# Altium PCB OFP_MCM_v1.6.PcbDoc (part 7 of 8)
Units mm, origin at the board's own origin, x right, y up, seen from the top; angles counter-clockwise.
Board outline 110 x 120 mm, 4 copper layers (Top Layer, Layer 1, Layer 2, Bottom Layer), stack 1.576 mm thick; 381 components, 285 nets, 1332 pads, 552 vias.
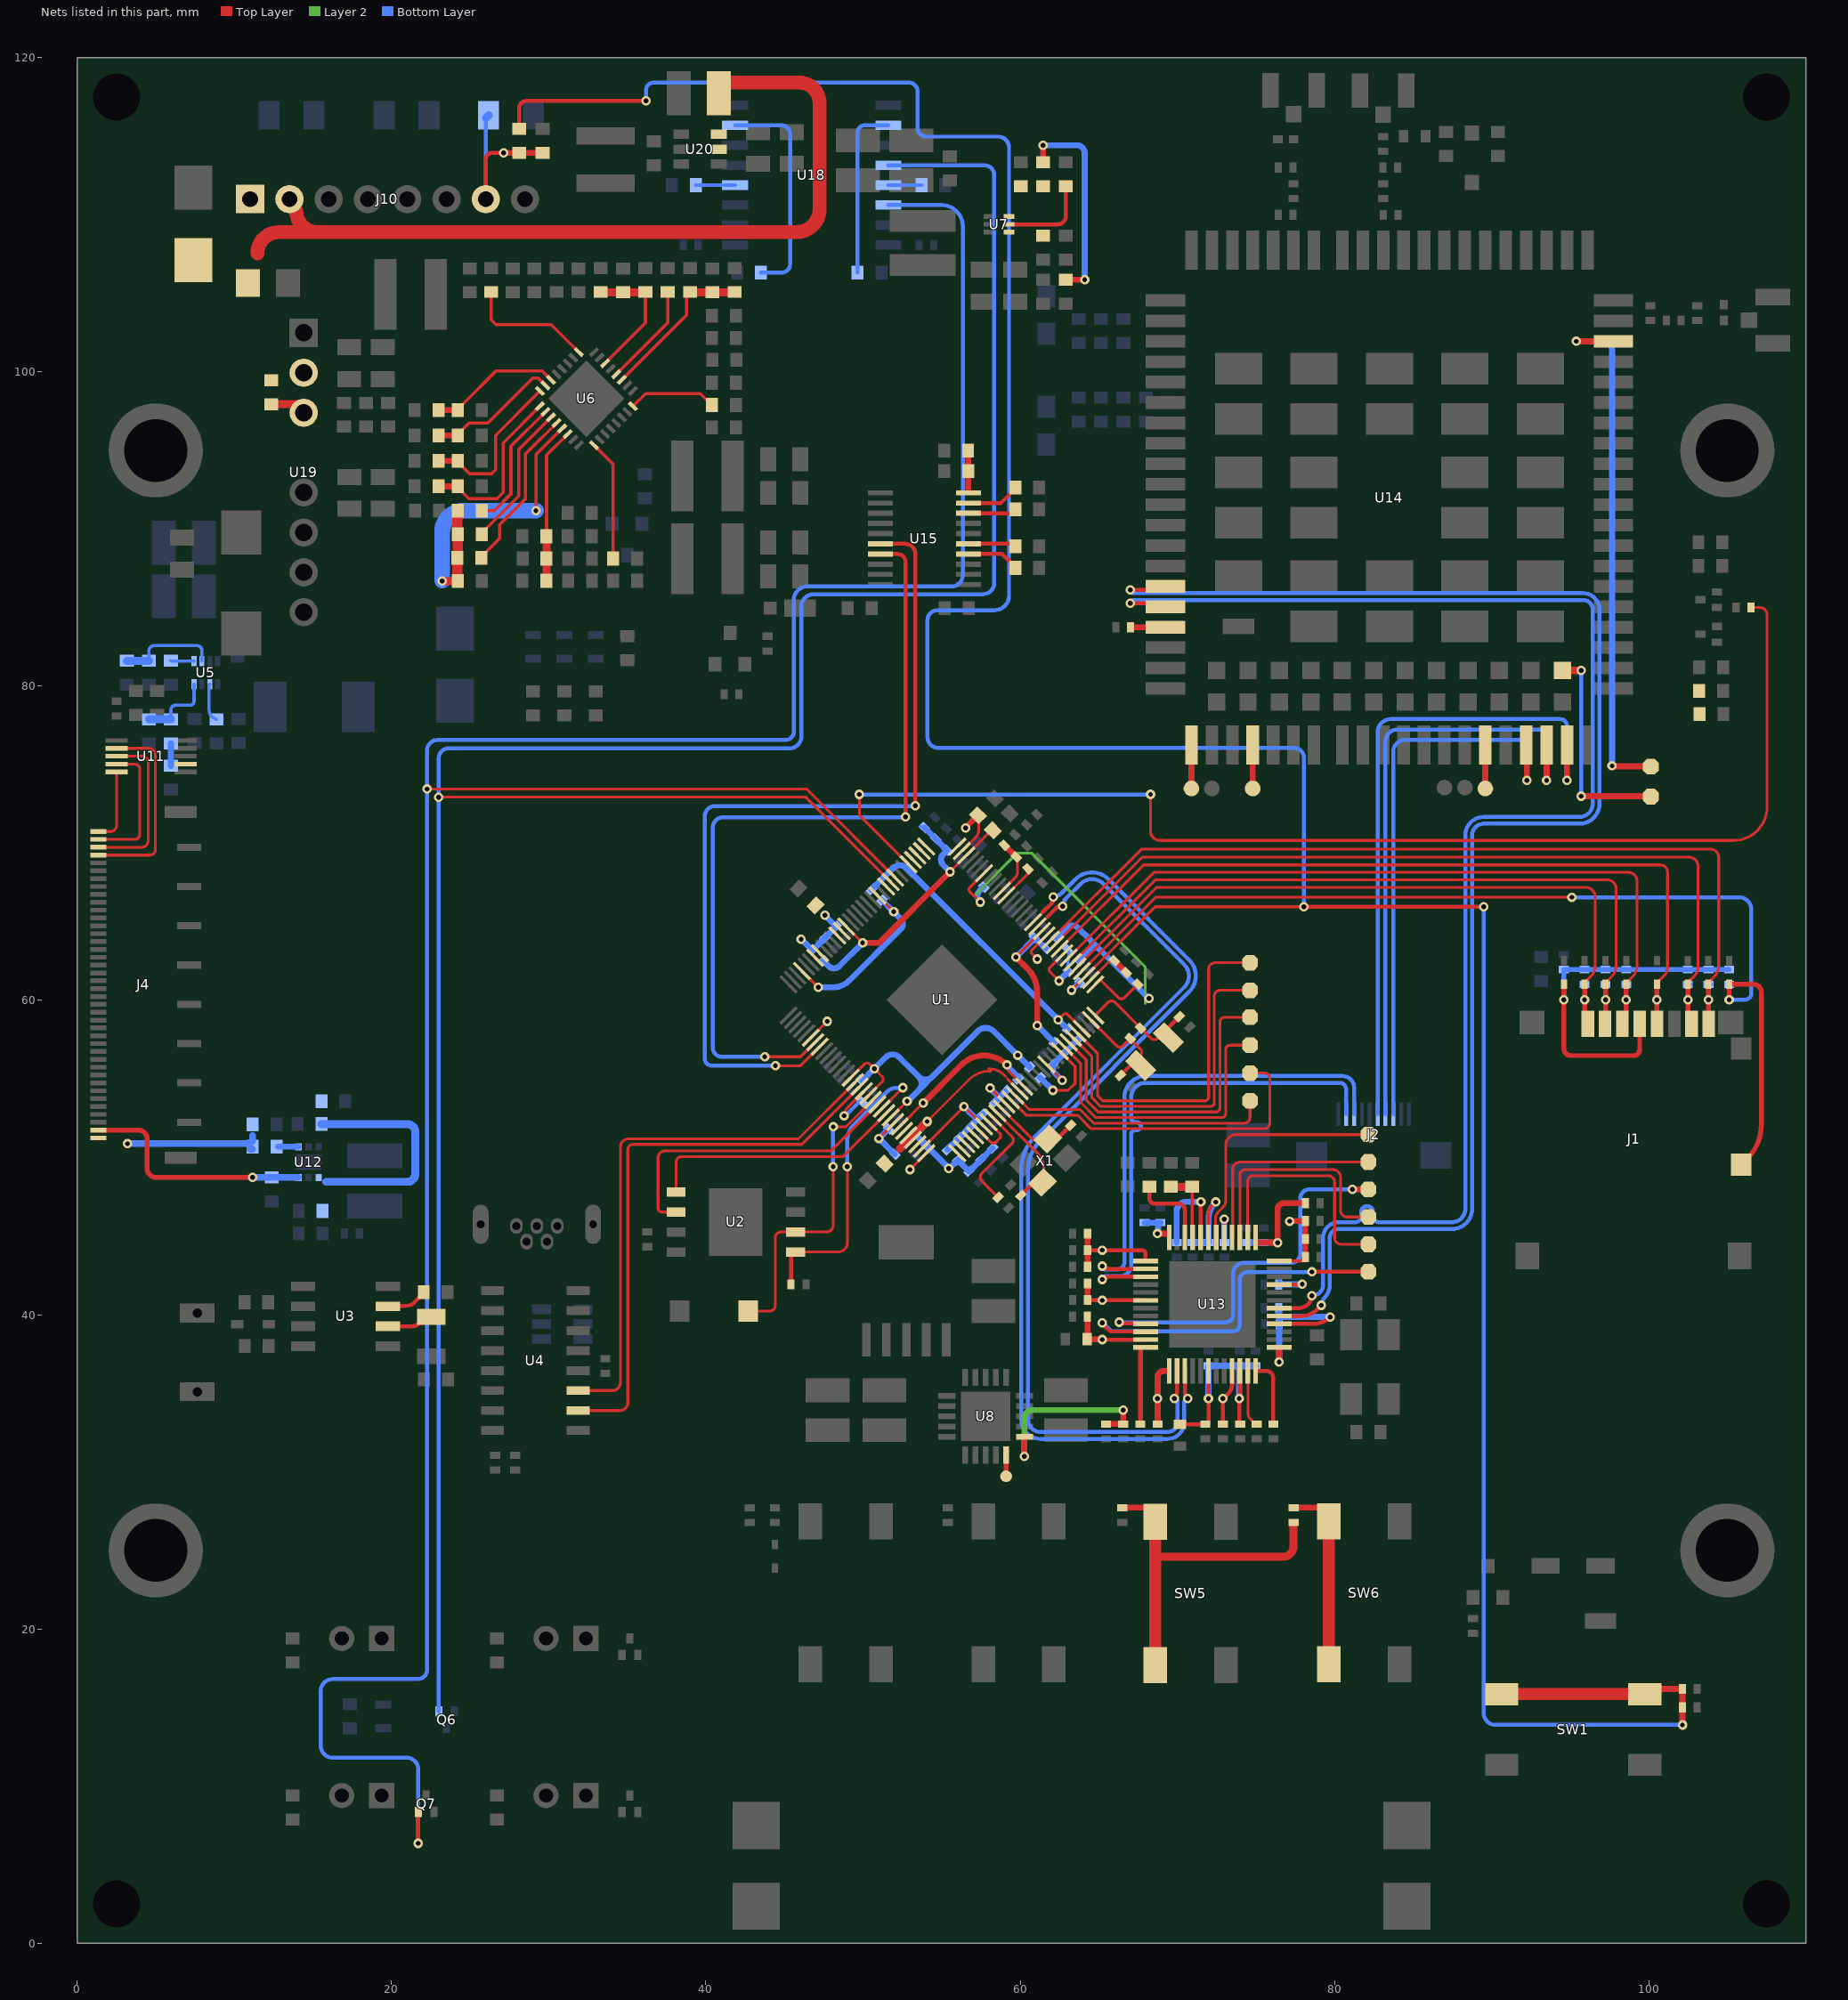
[diagram p6: the nets of this part, all layers, seen from the top]

## Via types
v1: diameter 0.6, hole 0.3, Top Layer to Bottom Layer, tented both sides, 552 vias

## Nets (pads, with @x,y where several pads share a name; then routed paths per layer and width w, separated by ;. In a path a pad name is that pad's centre, name@x,y a point inside that pad or via, vN(x,y) a via of type N, cw(c..) or ccw(c..) an arc to the next point about the centre after c; other vN are vias at no path point) (continued)
NetR15_2: R15.2 R16.2 SW5.3 SW5.4 | length 22.3
  Top Layer w0.254: 68.608,25.006 68.608,25.009
  Top Layer w0.381: R15.2@66.5,27.723 68.048,27.723 SW5.3@68.608,26.81
  Top Layer w0.508: 68.608,24.587 76.687,24.587 ccw(c76.687,25.3) 77.4,25.3 R16.2@77.4,26.716
  Top Layer w0.762: SW5.4@68.608,17.71 68.608,24.587 68.608,25.006 ; 68.608,25.009 SW5.3@68.608,26.81
NetR16_1: R16.1 SW6.3 SW6.4 | length 11.9
  Top Layer w0.381: R16.1@77.4,27.723 79.027,27.723 79.65,27.1 SW6.3@79.65,26.852
  Top Layer w0.762: SW6.4@79.65,17.752 SW6.3@79.65,26.852
NetR20_2: R20.2 U3.3 | length 2.6
  Top Layer w0.254: U3.3@19.77,40.536 20.418,40.558 20.874,40.558 ccw(c20.874,41.439) 21.535,40.857 21.794,41.151 R20.2@22.048,41.439
NetR39_1: R39.1 U5.6 | length 2.5
  Bottom Layer w0.203: U5.6@8.436,80.122 8.393,80.079 8.393,78.676 8.393,78.483 ccw(c9.067,78.483) 8.521,78.088 R39.1@8.864,77.889
NetR40_2: R40.2 R43.1 U5.2 | length 6.4
  Bottom Layer w0.203: R43.1@4.562,81.619 4.562,82.248 cw(c4.898,82.248) 4.898,82.583 7.606,82.583 cw(c7.606,82.253) 7.936,82.253 U5.2@7.936,81.592
  Bottom Layer w0.508: R40.2@3.162,81.619 R43.1@4.562,81.619
NetR41_1: R41.1 R46.1 | length 1.4
  Bottom Layer w0.381: R41.1@5.962,74.93 R46.1@5.962,76.365
NetR42_1: R42.1 U6.25 | length 8.2
  Top Layer w0.203: R42.1@26.345,105.089 26.345,103.312 26.642,103.015 30.16,103.015 U6.25@31.916,101.259
NetR44_2: R44.2 R46.2 U5.8 | length 4.9
  Bottom Layer w0.203: R46.2@5.962,77.889 5.962,78.486 cw(c6.259,78.486) 6.259,78.783 7.168,78.783 ccw(c7.168,79.05) 7.436,79.05 U5.8@7.436,80.122
  Bottom Layer w0.508: R44.2@4.562,77.889 R46.2@5.962,77.889
NetR45_2: R45.2 U5.1 | length 1.5
  Bottom Layer w0.203: R45.2@5.962,81.619 5.989,81.592 U5.1@7.436,81.592
NetR50_2: R50.2 U6.3 | length 9.3
  Top Layer w0.203: R50.2@25.74,89.675 26.019,89.954 26.019,90.029 28.1,92.11 28.1,95.061 U6.3@30.148,97.109
NetR51_2: R51.2 U6.2 | length 8.4
  Top Layer w0.203: R51.2@25.74,91.175 26.545,91.175 27.6,92.23 27.6,95.268 U6.2@29.794,97.462
NetR52_1: R52.1 U6.9 | length 7.7
  Top Layer w0.203: U6.9@32.884,95.341 34.1,94.125 R52.1@34.1,88.124
NetR55_2: R55.2 U6.4 | length 10.6
  Top Layer w0.203: R55.2@25.714,88.175 25.714,88.238 25.994,88.518 25.999,88.518 26.889,89.408 26.889,90.281 28.527,91.919 28.527,94.781 U6.4@30.501,96.755
NetR57_1: R57.1 U6.16 | length 5.7
  Top Layer w0.203: U6.16@35.359,97.816 36.169,98.625 39.652,98.625 R57.1@40.384,97.894
NetR58_1: R58.1 U7.4
NetR61_1: R61.1 R66.1 | length 13.3
  Top Layer w0.381: R66.1@61.456,113.333 v1(61.456,114.427) ; R61.1@62.897,105.868 v1@64.11,105.868
  Bottom Layer w0.381: v1(61.456,114.427) 63.602,114.427 cw(c63.602,113.919) 64.11,113.919 v1(64.11,105.867)
NetR62_2: R62.2 U7.5 | length 5.8
  Top Layer w0.254: U7.5@59.287,109.391 62.397,109.391 ccw(c62.397,109.891) 62.897,109.891 R62.2@62.897,111.809
NetR63_2: R63.2 R66.2 U7.6
NetR64_2: R64.2 U6.20 | length 6.6
  Top Layer w0.203: U6.20@34.299,99.845 37.574,103.121 R64.2@37.574,105.089
NetR67_1: R67.1 R68.2 U8.16 | length 12.1
  Top Layer w0.381: v1(60.276,30.988) U8.16@60.276,32.161 ; R67.1@65.459,33.047 R68.2@66.552,33.047 v1(66.552,33.924)
  Layer 2 w0.381: v1(60.276,30.988) 60.276,33.412 cw(c60.789,33.412) 60.789,33.924 v1(66.552,33.924)
NetR82_1: R82.1 R83.2 R85.2 U12.1 | length 14.9
  Bottom Layer w0.508: R85.2@15.538,52.133 21.001,52.133 cw(c21.001,51.625) 21.352,51.992 21.367,51.976 cw(c21.001,51.625) 21.508,51.625 21.508,48.946 cw(c21.022,48.946) 21.425,48.674 21.294,48.542 cw(c21.022,48.946) 21.022,48.46 15.843,48.46
NetR84_1: R84.1 U12.4 | length 1.3
  Bottom Layer w0.381: R84.1@12.78,50.689 U12.4@14.077,50.689
NetR87_2: R87.2 U13.24 | length 5.2
  Top Layer w0.178: R87.2@67.64,33.047 R87.2@67.67,33.077 ; U13.24@67.67,37.856 67.731,37.917 U13.24@67.982,37.917
  Top Layer w0.305: R87.2@67.67,33.077 U13.24@67.67,37.856
NetR88_2: R88.2 R89.2 U13.9 | length 4.6
  Top Layer w0.178: R88.2@70.947,48.139 70.947,44.952 U13.9@70.982,44.917
  Top Layer w0.508: R89.2@69.581,48.139 R88.2@70.972,48.139
NetR90_2: R90.2 U13.35 | length 3.6
  Top Layer w0.178: U13.35@74.482,36.417 74.504,36.395 74.504,33.744 ccw(c75.04,33.744) 74.661,33.365 74.828,33.198 74.828,33.187 74.968,33.047 R90.2@75.056,33.047
NetR91_2: R91.2 U13.36 | length 4.3
  Top Layer w0.254: U13.36@74.982,36.417 75.654,36.417 cw(c75.654,35.958) 76.113,35.958 R91.2@76.113,33.047
NetR92_1: R92.1 U13.5 | length 2.5
  Top Layer w0.254: U13.5@72.981,44.918 v1@72.981,46.086
  Bottom Layer w0.381: R92.1@72.98,44.736 v1(72.98,46.087)
NetR94_1: R94.1 U13.8 | length 6.2
  Top Layer w0.254: U13.8@71.482,44.917 71.491,44.925 71.491,47.176 v1(71.5,47.184)
  Bottom Layer w0.381: R94.1@69.962,44.587 69.962,46.59 cw(c70.557,46.59) 70.557,47.184 v1(71.5,47.184)
NetR95_2: R95.2 U13.10 | length 5.2
  Top Layer w0.254: R95.2@68.224,48.139 68.224,47.407 ccw(c68.565,47.407) 68.565,47.066 70.079,47.066 cw(c70.079,46.663) 70.482,46.663 U13.10@70.482,44.917
NetR102_1: R102.1 R104.1 U15.10 | length 2.6
  Top Layer w0.381: U15.10@56.696,92.371 R104.1@56.696,93.684 R102.1@56.696,94.984
NetR105_2: R105.2 U15.4 | length 3.4
  Top Layer w0.254: U15.4@56.71,88.409 58.86,88.409 59.422,87.846 59.436,87.846 59.69,87.592 R105.2@59.69,87.529
NetR106_2: R106.2 U15.5 | length 3
  Top Layer w0.254: U15.5@56.71,89.059 59.688,89.059 R106.2@59.69,89.056
NetR107_2: R107.2 U15.8 | length 3.1
  Top Layer w0.254: U15.8@56.71,91.009 59.441,91.009 R107.2@59.69,91.258
NetR108_2: R108.2 U15.9 | length 3.4
  Top Layer w0.254: U15.9@56.71,91.659 58.778,91.659 59.69,92.57 R108.2@59.69,92.634
NetR110_2: R110.2 R111.1
NetR115_2: 
NetR123_2: R123.2 U18.7 | length 14.3
  Bottom Layer w0.254: U18.7@41.861,115.696 44.792,115.696 cw(c44.792,115.123) 45.364,115.123 45.364,106.858 cw(c44.831,106.858) 44.831,106.325 R123.2@43.514,106.325
NetR124_1: R124.1 U18.10 | length 11.1
  Bottom Layer w0.254: R124.1@49.655,106.325 49.655,115.238 cw(c50.112,115.238) 50.112,115.696 U18.10@51.611,115.696
NetR125_2: R125.2 U19.3 | length 2.4
  Top Layer w0.508: R125.2@12.35,97.947 12.54,97.947 14.053,97.947 14.273,97.727 U19.3@14.406,97.405
NetR126_2: R126.2 U18.4 | length 2.5
  Bottom Layer w0.254: R126.2@39.368,111.886 U18.4@41.861,111.886
NetR127_1: R127.1 U18.13 | length 2.1
  Bottom Layer w0.254: U18.13@51.611,111.886 R127.1@53.714,111.886
NetTP1_1: TP1.1 U1.92 | length 22.8
  Top Layer w0.178: U1.92@63.646,57.913 64.92,56.639 64.92,53.952 65.259,53.614 71.745,53.614 ccw(c71.745,53.866) 71.997,53.866 71.997,62 cw(c72.396,62) 72.396,62.399 TP1.1@74.627,62.399
NetTP2_1: TP2.1 U1.91 | length 21.7
  Top Layer w0.178: U1.91@63.364,57.63 64.564,56.429 64.564,53.805 65.111,53.258 72.133,53.258 72.248,53.3 72.331,53.382 ccw(c72.133,53.477) 72.353,53.477 72.353,60.279 cw(c72.718,60.279) 72.718,60.644 TP2.1@74.627,60.644
NetTP3_1: TP3.1 U1.90 | length 20.7
  Top Layer w0.178: U1.90@63.081,57.347 64.209,56.219 64.209,53.658 64.964,52.903 72.461,52.903 ccw(c72.461,53.15) 72.708,53.15 72.708,58.62 cw(c73.018,58.62) 73.018,58.93 TP3.1@74.627,58.93
NetTP4_1: TP4.1 U1.89 | length 19.5
  Top Layer w0.178: U1.89@62.798,57.064 62.798,57.048 63.853,55.993 63.853,53.511 64.817,52.547 72.829,52.547 ccw(c72.829,52.798) 73.081,52.798 73.081,56.87 cw(c73.363,56.87) 73.363,57.152 TP4.1@74.627,57.152
NetTP5_1: TP5.1 U1.78 | length 16.9
  Top Layer w0.178: U1.78@59.687,53.953 60.582,53.058 63.02,53.058 63.023,53.061 63.538,53.061 63.541,53.058 63.803,53.058 64.669,52.191 74.271,52.191 ccw(c74.271,52.547) 74.627,52.547 TP5.1@74.627,53.614
NetTP6_1: TP6.1 U1.77 | length 21.8
  Top Layer w0.178: U1.77@59.404,53.67 60.373,52.702 63.167,52.702 63.17,52.705 63.391,52.705 63.394,52.702 63.656,52.702 64.522,51.836 75.509,51.836 ccw(c75.509,52.222) 75.895,52.222 75.895,55.042 ccw(c75.563,55.042) 75.563,55.374 TP6.1@74.627,55.374
NetTP7_1: TP7.1 U8.15 | length 1.4
  Top Layer w0.305: TP7.1@59.108,29.718 U8.15@59.108,31.07
NetTP8_1: TP8.1 U14.34 | length 33.9
  Top Layer w0.381: v1(95.394,101.95) U14.34@97.75,101.95 ; v1(97.663,74.93) 97.691,74.902 100.101,74.902 TP8.1@100.128,74.875
  Bottom Layer w0.381: v1(95.394,101.95) 97.108,101.95 cw(c97.108,101.395) 97.663,101.395 v1(97.663,74.93)
NetTP9_1: TP9.1 U13.2 | length 15.5
  Top Layer w0.178: U13.2@74.482,44.917 74.482,48.5 cw(c74.832,48.5) 74.832,48.85 79.58,48.85 cw(c79.58,48.421) 80.009,48.421 80.009,44.914 ccw(c80.445,44.914) 80.445,44.478 TP9.1@82.161,44.478
NetTP10_1: TP10.1 U14.128 | length 13.6
  Top Layer w0.381: v1(95.7,72.998) 100.101,72.998 TP10.1@100.128,72.97
  Top Layer w0.508: U14.128@94.5,81 v1(95.7,81)
  Bottom Layer w0.254: v1@95.7,73.025 v1(95.7,81)
NetTP11_1: TP11.1 U13.3 | length 15
  Top Layer w0.178: U13.3@73.982,44.917 73.982,48.881 cw(c74.332,48.881) 74.332,49.231 79.904,49.231 cw(c79.904,48.745) 80.39,48.745 80.39,46.632 ccw(c80.798,46.632) 80.798,46.224 TP11.1@82.161,46.224
NetTP12_1: TP12.1 U13.22 | length 23.5
  Top Layer w0.229: v1(65.22,39.486) 65.513,39.127 ccw(c65.955,39.486) 65.955,38.917 U13.22@67.982,38.917
  Top Layer w0.254: v1@78.564,42.731 TP12.1@82.161,42.731
  Bottom Layer w0.254: v1@65.22,39.512 65.681,39.05 ccw(c65.943,39.313) 65.943,38.942 73.551,38.942 ccw(c73.551,39.364) 73.972,39.364 73.972,42.231 cw(c74.448,42.231) 74.032,42.462 cw(c74.448,42.231) 74.448,42.706 78.544,42.706 ccw(c78.544,42.727) v1(78.564,42.727)
NetTP13_1: TP13.1 U13.21 | length 25.1
  Top Layer w0.254: v1(66.294,39.522) 66.388,39.522 66.47,39.439 67.96,39.439 U13.21@67.982,39.417
  Top Layer w0.381: v1(81.135,47.971) TP13.1@82.161,47.971
  Bottom Layer w0.254: v1(66.294,39.522) 73.102,39.522 ccw(c73.102,39.96) 73.54,39.96 73.54,42.603 cw(c74.24,42.603) 74.24,43.303 77.245,43.303 ccw(c77.245,43.879) 77.821,43.879 77.821,47.384 cw(c78.408,47.384) 78.408,47.971 v1(81.135,47.971)
NetTP14_1: TP14.1 U13.4 | length 13.3
  Top Layer w0.178: U13.4@73.482,44.917 73.522,44.956 73.522,49.263 cw(c73.976,49.263) 73.976,49.718 TP14.1@82.161,49.718
NetTP15_1: TP15.1 U13.6 | length 15.6
  Top Layer w0.178: U13.6@72.482,44.917 72.439,44.96 72.439,46.138 cw(c73.001,46.138) 72.603,46.535 72.912,46.844 ccw(c72.505,47.251) 73.081,47.251 73.081,50.8 cw(c73.745,50.8) 73.745,51.464 TP15.1@82.161,51.464
NetU3_2: U3.2 X3.2 | length 2.9
  Top Layer w0.254: U3.2@19.77,39.266 21.321,39.266 ccw(c21.321,39.866) 21.79,39.493 X3.2@22.535,39.866
NRST: D19.1 J10.7 R118.1 R119.1 | length 11.8
  Top Layer w0.254: J10.7@26,111 26,113.528 cw(c26.416,113.528) 26.416,113.944 v1(27.138,113.944)
  Top Layer w0.381: v1(27.138,113.944) R119.1@28.124,113.944 R118.1@29.608,113.944
  Bottom Layer w0.254: J10.7@26,111 D19.1@26,116.158
  Bottom Layer w0.508: D19.1@26,116.158 D19.1@26.174,116.332
PCA0: 
PCA1: 
PCA2: 
PCA3: 
PCA4: 
PCA5: 
PCA6: 
PCA7: 
PE20: U1.10
PENIRQ: U11.7
PG0: R117.2 U1.5 | length 80.9
  Top Layer w0.178: v1(49.77,73.111) 49.77,71.789 U1.5@52.899,68.66 ; v1(68.3,73.111) 68.3,70.773 ccw(c68.893,70.773) 68.894,70.18 105.399,70.18 ccw(c105.399,72.31) 107.529,72.31 107.529,84.554 ccw(c107.081,84.554) 107.081,85.003 R117.2@106.494,85.003
  Bottom Layer w0.254: v1(49.77,73.111) v1(68.3,73.111)
PG1: U1.4
PG2: U1.3
PG3: U1.2
PG5: U1.128
RTC_VIO: C25.2 U1.97 | length 3.7
  Top Layer w0.178: U1.97@64.778,61.023 65.079,61.325 65.095,61.325 66.24,60.18 66.241,60.179 ccw(c66.439,60.377) 66.638,60.179 C25.2@67.492,61.033
SDC0-CLK0: D2.2 J1.5 U1.105 | length 51.1
  Top Layer w0.178: U1.105@62.515,63.286 67.853,68.624 100.743,68.624 cw(c100.743,68.176) 101.191,68.176 101.191,62.031 cw(c100.616,62.031) 101.023,61.625 100.522,61.124 D2.2@100.522,61.024
  Top Layer w0.305: J1.5@100.522,58.505 v1(100.522,60.049) D2.2@100.522,61.024
SDC0-CMD: D3.2 J1.3 R2.1 U1.103 | length 49.2
  Top Layer w0.178: U1.103@63.081,62.721 68.51,68.15 98.702,68.15 cw(c98.702,67.608) 99.244,67.608 99.244,62.149 cw(c98.37,62.149) 98.988,61.531 98.582,61.124 D3.2@98.582,61.024 D3.2@98.556,60.999 ; J1.3@98.322,58.505 J1.3@98.556,58.739
  Top Layer w0.305: J1.3@98.556,58.739 v1(98.556,60.049) D3.2@98.556,60.999
  Bottom Layer w0.203: R2.1@98.556,61.003 R2.1@98.582,61.029
  Bottom Layer w0.254: v1(98.556,60.049) R2.1@98.556,61.003
SDC0-D0: D4.2 J1.7 R3.1 U1.106 | length 55
  Top Layer w0.178: U1.106@62.232,63.569 67.787,69.124 102.554,69.124 cw(c102.554,68.542) 103.137,68.542 103.137,62.156 cw(c102.272,62.156) 102.883,61.545 102.463,61.124 102.463,61.024 D4.2@102.492,60.995 ; J1.7@102.492,58.735 J1.7@102.722,58.505
  Top Layer w0.305: J1.7@102.492,58.735 v1(102.492,60.049) D4.2@102.492,60.995
  Bottom Layer w0.203: R3.1@102.492,60.902 102.619,61.029 R3.1@102.68,61.029
  Bottom Layer w0.254: v1(102.492,60.049) R3.1@102.492,60.902
SDC0-D1: D5.2 J1.8 R4.1 U1.107 | length 57.1
  Top Layer w0.178: U1.107@61.949,63.852 67.721,69.624 103.934,69.624 cw(c103.934,69.107) 104.452,69.107 104.452,62.244 cw(c103.332,62.244) 104.124,61.453 ; J1.8@103.796,58.532 J1.8@103.822,58.505 ; D5.2@103.796,61.024 103.796,61.124 104.124,61.452
  Top Layer w0.305: J1.8@103.796,58.532 v1(103.796,60.049) D5.2@103.796,61.024
  Bottom Layer w0.203: R4.1@103.796,60.902 103.923,61.029 R4.1@104,61.029
  Bottom Layer w0.254: v1(103.796,60.049) R4.1@103.796,60.902
SDC0-D2: D6.2 J1.1 R5.1 U1.101 | length 44.8
  Top Layer w0.178: U1.101@63.646,62.155 68.692,67.201 95.993,67.201 cw(c95.993,66.604) 96.59,66.604 96.59,62.176 cw(c95.682,62.176) 96.324,61.534 96.016,61.226 96.016,61.123 D6.2@95.917,61.024 ; J1.1@95.917,58.71 J1.1@96.122,58.505
  Top Layer w0.305: J1.1@95.917,58.71 v1(95.917,60.049) D6.2@95.917,61.024
  Bottom Layer w0.254: v1(95.917,60.049) R5.1@95.917,61.029
SDC0-D3: D7.2 J1.2 R6.1 U1.102 | length 46.8
  Top Layer w0.178: U1.102@63.364,62.438 68.596,67.67 97.363,67.67 cw(c97.363,67.116) 97.917,67.116 97.917,62.16 cw(c97.026,62.16) 97.656,61.531 D7.2@97.25,61.124 ; J1.2@97.222,58.505 J1.2@97.275,58.558
  Top Layer w0.305: J1.2@97.25,58.558 v1(97.25,60.049) D7.2@97.25,61.024
  Bottom Layer w0.254: v1(97.25,60.049) R6.1@97.25,61.029
SDC0-DET: D8.2 J1.SN R7.1 U1.100 | length 67.8
  Top Layer w0.178: U1.100@63.929,61.872 68.624,66.567 69.6,66.567 v1(95.098,66.567)
  Top Layer w0.305: v1(105.117,60.049) D8.2@105.117,61.024 106.674,61.024 cw(c106.674,60.536) 107.162,60.536 107.162,52.082 cw(c104.141,52.082) 106.434,50.114 J1.SN@105.877,49.545
  Bottom Layer w0.254: v1(95.098,66.567) 105.747,66.567 cw(c105.747,65.786) 106.528,65.786 106.528,60.455 cw(c106.121,60.455) 106.121,60.049 v1(105.117,60.049) 105.117,60.902 105.244,61.029 R7.1@105.321,61.029
SPI-CLK: U1.53 U2.6 | length 19.9
  Top Layer w0.178: U2.6@38.115,46.535 37.207,46.535 cw(c37.207,46.786) 36.957,46.786 36.957,49.983 cw(c37.392,49.983) 37.392,50.419 47.951,50.419 U1.53@50.919,53.387
SPI-CS: R10.1 U1.54 U2.1 | length 19.5
  Top Layer w0.178: U2.1@45.715,43.995 48.426,43.995 ccw(c48.426,44.571) 49.002,44.571 v1(49.002,49.414) ; U1.54@51.202,53.105 v1(52.545,54.448)
  Top Layer w0.254: R10.1@45.426,41.93 45.426,43.822 45.599,43.995 U2.1@45.715,43.995
  Bottom Layer w0.254: v1(49.002,49.414) 49.002,51.137 cw(c50.261,51.137) 49.37,52.027 51.524,54.181 cw(c52.168,53.538) 52.168,54.448 v1(52.545,54.448)
SPI-MISO: SW2.1 U1.52 U2.2 | length 20
  Top Layer w0.178: SW2.1@42.699,40.227 44.059,40.227 ccw(c44.059,40.582) 44.413,40.582 44.413,44.899 cw(c44.779,44.899) 44.779,45.265 U2.2@45.715,45.265 47.67,45.265 ccw(c47.67,45.695) 48.1,45.695 v1(48.1,49.414) v1@48.1,49.567 ; v1@48.148,51.961 48.927,51.961 U1.52@50.636,53.67
  Bottom Layer w0.254: v1(48.1,49.414) v1@48.1,51.961
  other v1: 48.108,51.961
SPI-MOSI: U1.55 U2.5 | length 16.6
  Top Layer w0.178: U2.5@38.115,47.805 38.115,49.715 cw(c38.463,49.715) 38.463,50.063 48.727,50.063 U1.55@51.485,52.822
SVREF: C14.2 C15.2 R27.1 R29.2 U1.63 U1.71 | length 9.4
  Top Layer w0.178: U1.63@53.748,50.559 v1@56.401,53.212 ; v1@56.463,53.217 U1.71@57.707,51.973
  Bottom Layer w0.381: R27.1@55.366,50.505 R29.2@56.117,51.256 C14.2@56.868,52.007 ; 56.669,53.011 57.258,52.422 ; C14.2@56.969,52.134 57.198,52.363 ; 57.156,52.295 C15.2@57.618,52.758
  other v1: 56.426,53.237
SZQ: R30.2 U1.73 | length 6.9
  Top Layer w0.178: U1.73@58.273,52.539 58.74,52.071 59.478,51.334 cw(c59.261,51.116) 59.478,50.899 57.56,48.981 ccw(c57.796,48.744) 57.56,48.507 R30.2@58.6,47.467
TPS_EN1: R70.1 R74.2 U6.31 | length 8.5
  Top Layer w0.203: R74.2@24.216,95.955 24.216,96.019 24.954,96.758 26.144,96.758 28.986,99.6 29.332,99.6 U6.31@29.794,99.138
  Top Layer w0.381: R70.1@22.987,95.955 R74.2@24.216,95.955
TPS_EN2: R71.1 R75.2 U6.32 | length 10.3
  Top Layer w0.203: R75.2@24.216,94.336 24.216,94.273 24.961,93.528 26.37,93.528 26.615,93.773 26.615,95.959 U6.32@29.441,98.784
  Top Layer w0.381: R71.1@22.987,94.336 R75.2@24.216,94.336
TPS_EN3: R72.1 R76.2 U6.1 | length 11.1
  Top Layer w0.203: R76.2@24.216,92.717 24.216,92.654 24.928,91.941 26.714,91.941 27.1,92.327 27.1,95.475 U6.1@29.441,97.816
  Top Layer w0.381: R72.1@22.987,92.717 R76.2@24.216,92.717
TPS_FB1: C55.2 R47.2 R48.1 U6.22 | length 8.3
  Top Layer w0.203: U6.22@33.591,100.552 36.153,103.114 R47.2@36.153,105.089
  Top Layer w0.381: R47.2@35.769,105.063 R47.2@36.044,105.063
  Top Layer w0.508: R48.1@33.312,105.063 C55.2@34.732,105.063 R47.2@35.769,105.063
TPS_FB2: C66.2 R53.2 R54.1 U6.6 | length 10.2
  Top Layer w0.203: R54.1@29.864,89.236 29.864,94.703 U6.6@31.208,96.048
  Top Layer w0.508: C66.2@29.854,86.705 R54.1@29.854,89.541
TPS_FB3: C73.2 R59.1 R60.1 U6.19 | length 9.9
  Top Layer w0.203: U6.19@34.652,99.492 38.777,103.617 38.777,104.871 R60.1@38.995,105.089
  Top Layer w0.508: R60.1@39.198,105.063 C73.2@40.416,105.063 R59.1@41.707,105.063
TPS_VDIV: R69.1 R73.2 U6.30 | length 8.5
  Top Layer w0.203: R73.2@24.216,97.574 24.216,97.638 24.495,97.917 24.503,97.917 26.635,100.05 29.589,100.05 U6.30@30.148,99.492
  Top Layer w0.381: R69.1@22.987,97.574 R73.2@24.216,97.574
TS_XN: J4.39 U11.4 | length 8.6
  Top Layer w0.178: J4.39@1.345,70.25 3.655,70.25 ccw(c3.655,70.578) 3.983,70.578 3.983,74.695 ccw(c3.634,74.695) 3.634,75.045 U11.4@2.501,75.045
TS_XP: J4.37 U11.2 | length 12.6
  Top Layer w0.178: J4.37@1.345,69.25 4.632,69.25 ccw(c4.632,69.589) 4.971,69.589 4.971,75.639 ccw(c4.566,75.639) 4.566,76.045 U11.2@2.501,76.045
TS_YN: J4.40 U11.5 | length 4.8
  Top Layer w0.178: J4.40@1.345,70.75 2.131,70.75 ccw(c2.131,71.12) 2.501,71.12 U11.5@2.501,74.545
TS_YP: J4.38 U11.3 | length 10.6
  Top Layer w0.178: J4.38@1.345,69.75 4.107,69.75 ccw(c4.107,70.156) 4.513,70.156 4.513,75.156 ccw(c4.125,75.156) 4.125,75.545 U11.3@2.501,75.545
UART0_RX: U1.49 U4.2 | length 36
  Top Layer w0.178: U4.2@31.873,33.904 34.532,33.904 ccw(c34.532,34.409) 35.037,34.409 35.037,50.52 cw(c35.352,50.52) 35.352,50.835 46.104,50.835 U1.49@49.788,54.519
UART0_TX: U1.48 U4.3 | length 34.7
  Top Layer w0.178: U4.3@31.873,35.174 34.06,35.174 ccw(c34.06,35.691) 34.576,35.691 34.576,50.703 cw(c35.064,50.703) 35.064,51.191 45.895,51.191 U1.48@49.505,54.801
UART1_RX: Q7.2 U1.8 U18.14 | length 187.3
  Top Layer w0.178: v1@22.139,73.457 46.405,73.457 U1.8@52.05,67.812
  Top Layer w0.254: Q7.2@21.697,8.352 Q7.2@21.7,8.35 21.7,6.362 v1(21.702,6.36)
  Bottom Layer w0.254: v1(21.702,6.36) 21.702,11.064 ccw(c20.955,11.064) 20.955,11.811 16.256,11.811 cw(c16.256,12.573) 15.494,12.573 15.494,16.045 cw(c16.264,16.045) 16.264,16.815 21.671,16.815 ccw(c21.671,17.409) 22.266,17.409 v1(22.266,73.457) 22.266,75.914 cw(c22.925,75.914) 22.925,76.573 45.062,76.573 ccw(c45.062,77.107) 45.595,77.107 45.595,85.465 cw(c46.485,85.465) 46.485,86.354 55.646,86.354 ccw(c55.646,87.061) 56.353,87.061 56.353,109.258 ccw(c54.996,109.258) 54.996,110.616 U18.14@51.611,110.616
UART1_TX: Q6.2 U1.9 U18.12 | length 170
  Top Layer w0.178: v1(23.004,72.936) 46.36,72.936 U1.9@51.767,67.529
  Bottom Layer w0.254: Q6.2@23.004,14.749 v1(23.004,72.936) 23.004,75.408 cw(c23.634,75.408) 23.634,76.039 45.313,76.039 ccw(c45.313,76.807) 46.081,76.807 46.081,85.074 cw(c46.859,85.074) 46.859,85.852 57.642,85.852 ccw(c57.642,86.555) 58.345,86.555 58.345,112.526 ccw(c57.715,112.526) 57.715,113.156 U18.12@51.611,113.156
UART2_RX: U1.40 U15.16 | length 55.9
  Top Layer w0.178: v1(44.428,55.845) 46.023,55.845 U1.40@47.242,57.064
  Top Layer w0.254: U15.16@51.11,89.059 52.681,89.059 cw(c52.681,88.409) 53.331,88.409 v1(53.331,72.387)
  Bottom Layer w0.254: v1(44.428,55.845) 40.39,55.845 cw(c40.39,56.309) 39.926,56.309 39.926,71.715 cw(c40.57,71.715) 40.57,72.359 v1@53.303,72.359
UART2_TX: U1.39 U15.17 | length 52
  Top Layer w0.178: v1(43.748,56.418) 46.03,56.418 U1.39@46.959,57.347
  Top Layer w0.254: U15.17@51.11,88.409 52.207,88.409 cw(c52.207,87.902) 52.714,87.902 v1(52.714,71.687)
  Bottom Layer w0.254: v1(43.748,56.418) 41.017,56.418 cw(c41.017,56.998) 40.437,56.998 40.437,70.984 cw(c41.112,70.984) 41.112,71.659 v1@52.686,71.659
USB-D_N: U1.110 U13.27 | length 60.4
  Top Layer w0.254: 61.731,65.308 62.315,65.892 cw(c62.495,65.713) 62.47,65.965 v1(62.711,65.989) ; U13.27@70.482,36.417 70.482,35.098 ccw(c71.086,35.098) v1(70.659,34.671)
  Bottom Layer w0.254: v1(62.711,65.989) ccw(c62.551,66.149) 62.777,66.149 cw(c63.272,66.149) 62.922,66.499 63.836,67.413 ; 63.836,67.413 63.838,67.415 cw(c64.574,66.679) 65.312,67.414 ; 65.312,67.414 70.449,62.276 cw(c69.74,61.564) 70.451,60.854 60.923,51.308 ccw(c61.409,50.824) 60.914,51.299 60.852,51.234 ccw(c61.347,50.759) 60.841,51.222 ccw(c62.986,49.248) 60.071,49.248 60.071,33.332 ccw(c61.305,33.332) 61.305,32.098 69.373,32.098 ccw(c69.373,33.173) 70.448,33.173 70.448,34.46 cw(c70.659,34.46) v1(70.659,34.671)
USB-D_P: U1.111 U13.26 | length 60
  Top Layer w0.254: 61.426,65.614 62.009,66.197 ; 62.01,66.198 ccw(c61.83,66.377) 62.083,66.352 v1(62.107,66.593) ; v1(69.805,34.671) ccw(c69.378,35.098) 69.982,35.098 U13.26@69.982,36.417
  Bottom Layer w0.254: v1(62.107,66.593) cw(c62.267,66.433) 62.267,66.659 ccw(c62.267,67.154) 62.616,66.804 63.531,67.718 63.533,67.72 cw(c64.574,66.679) 65.616,67.72 65.617,67.719 70.755,62.581 cw(c69.74,61.564) 70.756,60.549 61.229,51.003 ccw(c61.409,50.824) 61.226,51 61.163,50.935 ccw(c61.347,50.759) 61.159,50.93 ccw(c62.986,49.248) 60.503,49.248 60.503,33.332 ccw(c61.305,33.332) 61.305,32.53 61.94,32.53 66.157,32.53 69.373,32.53 ccw(c69.373,33.173) 70.016,33.173 70.016,34.46 ccw(c69.805,34.46) v1(69.805,34.671)
USB-GSM-D_N: U13.42 U14.70 | length 95.7
  Top Layer w0.254: v1(67.018,85.273) 69.027,85.273 cw(c69.027,85.05) U14.70@69.25,85.05 ; U13.42@76.482,40.417 77.688,40.417 ccw(c77.688,41.357) 78.353,40.692 ccw(c78.003,41.042) 78.498,41.042 cw(c78.724,41.042) v1(78.564,41.202)
  Bottom Layer w0.254: v1(67.018,85.273) cw(c67.229,85.273) 67.229,85.484 95.823,85.484 cw(c95.823,84.872) 96.434,84.872 96.434,72.467 cw(c96.18,72.468) 96.43,72.424 96.421,72.373 cw(c95.593,72.52) 95.74,71.692 95.689,71.683 cw(c95.645,71.933) 95.646,71.679 89.49,71.679 ccw(c89.49,70.519) 88.33,70.519 88.33,46.687 cw(c88.076,46.688) 88.326,46.644 88.317,46.592 cw(c87.476,46.74) 87.625,45.9 87.573,45.891 cw(c87.529,46.141) 87.53,45.887 83.868,45.887 82.84,45.887 cw(c82.84,46.268) 82.459,46.268 82.459,46.534 ccw(c82.078,46.534) 81.697,46.534 81.697,46.268 cw(c81.316,46.268) 81.316,45.887 81.189,45.887 80.271,45.887 ccw(c80.271,44.889) 79.272,44.889 79.272,42.778 ccw(c79.704,42.778) 79.273,42.747 cw(c79.02,42.729) 79.274,42.729 79.274,41.897 cw(c78.59,41.897) 79.074,41.413 cw(c78.724,41.763) 78.724,41.268 ccw(c78.724,41.042) v1(78.564,41.202)
USB-GSM-D_P: U13.41 U14.69 | length 95.8
  Top Layer w0.254: v1(67.018,86.127) 69.027,86.127 ccw(c69.027,86.35) U14.69@69.25,86.35 ; U13.41@76.482,39.917 77.888,39.917 ccw(c77.888,41.363) 78.91,40.34 v1(79.168,40.598)
  Bottom Layer w0.254: v1(67.018,86.127) ccw(c67.229,86.127) 67.229,85.916 95.823,85.916 cw(c95.823,84.872) 96.866,84.872 96.866,72.467 cw(c96.18,72.468) 96.856,72.348 96.846,72.297 cw(c95.593,72.52) 95.816,71.267 95.765,71.258 cw(c95.645,71.933) 95.647,71.247 89.49,71.247 ccw(c89.49,70.519) 88.761,70.519 88.761,46.686 cw(c88.076,46.688) 88.751,46.569 88.742,46.517 cw(c87.476,46.74) 87.7,45.475 87.648,45.466 cw(c87.529,46.141) 87.531,45.455 80.271,45.455 ccw(c80.271,44.889) 79.704,44.889 79.704,43.57 ; v1(79.168,40.598) ccw(c79.008,40.758) 79.234,40.758 cw(c79.729,40.758) 79.379,41.108 ; 79.38,41.108 ccw(c78.592,41.896) 79.706,41.896 79.706,43.57
USB-ID: U1.1
USB-PD-D_N: J2.2 U13.15 | length 32.7
  Top Layer w0.254: v1(65.22,42.24) cw(c65.648,41.812) 65.648,42.417 U13.15@67.982,42.417
  Bottom Layer w0.254: v1(65.22,42.24) cw(c65.432,42.24) 65.432,42.451 66.343,42.451 ccw(c66.343,43.173) 67.066,43.173 67.066,50.857 67.066,51.492 cw(c67.32,51.492) 67.32,51.746 67.423,51.746 ccw(c67.423,52) 67.423,52.254 67.32,52.254 cw(c67.32,52.508) 67.066,52.508 67.066,53.614 67.066,53.795 ; 67.065,53.795 cw(c67.988,53.832) 67.988,54.755 67.991,54.755 80.316,54.755 cw(c80.316,54.322) 80.749,54.322 J2.2@80.749,52.758
USB-PD-D_P: J2.3 U13.14 | length 32.6
  Top Layer w0.254: v1(65.22,43.094) ccw(c65.648,43.521) 65.648,42.917 U13.14@67.982,42.917
  Bottom Layer w0.254: v1(65.22,43.094) ccw(c65.432,43.094) 65.432,42.883 66.165,42.883 ccw(c66.165,43.352) 66.634,43.352 66.634,53.778 cw(c67.988,53.832) 67.988,55.187 67.991,55.187 80.521,55.187 cw(c80.521,54.459) 81.249,54.459 J2.3@81.249,52.758
USB_VBUS: R96.1 U14.71 | length 2.2
  Top Layer w0.381: R96.1@67.018,83.75 U14.71@69.25,83.75
USIM_CLK: J2.7 U14.16 | length 39.8
  Top Layer w0.381: v1(93.5,74) U14.16@93.5,76.25
  Bottom Layer w0.254: J2.7@83.249,52.758 83.249,76.489 cw(c84,76.489) 84,77.24 93.153,77.24 cw(c93.153,76.893) 93.5,76.893 v1(93.5,74)
USIM_DATA: J2.8 U14.15 | length 36.7
  Top Layer w0.254: U14.15@92.2,76.25 U14.15@92.25,76.2
  Top Layer w0.381: v1(92.25,74) U14.15@92.25,76.2
  Bottom Layer w0.254: J2.8@83.749,52.758 83.749,75.852 cw(c84.478,75.852) 84.478,76.581 91.937,76.581 cw(c91.937,76.268) 92.25,76.268 v1(92.25,74)
USIM_PRE: pad.2@89.6,73.492 U14.13 | length 2.8
  Top Layer w0.381: pad.2@89.6,73.492 U14.13@89.6,76.25
USIM_RST: J2.6 U14.17 | length 42.8
  Top Layer w0.381: v1(94.8,74) U14.17@94.8,76.25
  Bottom Layer w0.254: J2.6@82.749,52.758 82.749,77.078 cw(c83.573,77.078) 83.573,77.902 94.375,77.902 cw(c94.375,77.477) 94.8,77.477 v1(94.8,74)
V3S_RST: C3.2 C32.2 R1.1 R119.2 SW1.1 SW1.2 U1.99 | length 220
  Top Layer w0.178: v1(63.276,60.652) U1.99@64.212,61.589 68.587,65.964 v1(78.049,65.964)
  Top Layer w0.254: R119.2@28.124,115.468 28.124,116.765 cw(c28.614,116.765) 28.614,117.255 v1(36.188,117.255) ; v1(78.049,65.964) v1(89.5,65.964)
  Top Layer w0.381: SW1.2@100.08,16.18 R1.1@102.146,16.18 C3.2@102.146,15.015 v1(102.146,13.894)
  Top Layer w0.762: SW1.1@90.65,15.85 SW1.2@99.75,15.85
  Bottom Layer w0.178: C32.2@63.765,61.142 C32.2@63.793,61.142
  Bottom Layer w0.254: v1(36.188,117.255) 36.188,117.902 cw(c36.703,117.902) 36.703,118.417 52.906,118.417 cw(c52.906,117.856) 53.467,117.856 53.467,115.54 ccw(c54.034,115.54) 54.034,114.972 58.609,114.972 cw(c58.609,114.29) 59.292,114.29 59.292,85.758 cw(c58.369,85.758) 58.369,84.836 54.737,84.836 ccw(c54.737,84.201) 54.102,84.201 54.102,76.765 ccw(c54.794,76.765) 54.794,76.073 55.499,76.073 77.437,76.073 cw(c77.437,75.461) 78.049,75.461 v1@78.049,66.2 ; v1(89.5,65.964) 89.5,16.77 89.5,14.656 ccw(c90.273,14.656) 89.916,13.97 ccw(c90.227,14.568) 90.227,13.894 ; 90.229,13.894 v1(102.146,13.894)
  Bottom Layer w0.381: v1(63.276,60.652) C32.2@63.765,61.142
V7V: C64.2 R50.1 R51.1 R55.1 U6.5 | length 21.1
  Top Layer w0.203: v1(29.189,91.167) 29.189,94.735 U6.5@30.855,96.401
  Top Layer w0.508: v1@23.223,86.692 C64.2@24.216,86.692
  Top Layer w0.635: C64.2@24.19,86.717 R55.1@24.19,88.175 ; R50.1@24.19,89.7 R51.1@24.19,91.149 ; R55.1@24.216,88.175 R50.1@24.216,89.675
  Bottom Layer w1.016: v1@23.223,86.742 23.223,89.793 cw(c24.597,89.793) 24.597,91.167 v1(29.189,91.167)
  other v1: 23.223,86.7
VCC-DRAM: C16.2 C17.2 C18.2 C45.2 C46.2 R27.2 R38.2 U1.59 U1.60 U1.61 U1.62 U1.65 U1.66 U1.67 U1.68 U1.69 U1.70 U1.72 U1.79 | length 21.1
  Top Layer w0.178: v1(54.084,52.299) 56.718,54.932 cw(c58.114,53.538) 58.114,55.511 ; U1.70@57.424,51.69 57.629,51.486 57.892,51.223 58.131,50.984 ccw(c58.29,51.143) 58.45,50.984 58.697,51.231 ccw(c58.54,51.389) 58.698,51.547 58.457,51.788 U1.72@57.99,52.256 ; 57.987,55.663 cw(c57.987,54.236) 59.066,55.17 ; 59.193,55.018 59.226,54.979 U1.79@59.97,54.236
  Top Layer w0.508: 52.355,50.569 53.046,51.26 v1(54.084,52.299)
  Bottom Layer w0.178: C45.2@53.181,51.61 C45.2@53.185,51.61 ; R27.2@56.031,49.841 R27.2@56.033,49.841
  Bottom Layer w0.381: C45.2@53.236,51.559 v1@55.472,49.323 ; v1@55.498,49.308 R27.2@56.029,49.839 ; R27.2@56.033,49.841 R38.2@56.748,49.126 ; R38.2@56.762,49.127 C18.2@57.504,49.868 ; C18.2@57.503,49.869 C17.2@58.246,50.613
  Bottom Layer w0.508: C45.2@53.379,51.584 v1@54.068,52.273
  other v1: 55.447,49.308
VCC-HP: C31.2 R22.2 R23.1 U1.122 | length 31.4
  Top Layer w0.178: v1(57.463,66.262) 56.793,66.932 cw(c56.916,67.056) 56.792,67.18 U1.122@57.707,68.094
  Layer 2 w0.178: 57.082,66.643 59.819,69.38 60.724,69.38 67.953,62.151 67.953,59.805
  Bottom Layer w0.178: C31.2@57.683,67.244 C31.2@57.691,67.244
  Bottom Layer w0.381: v1@57.425,66.316 cw(c57.76,66.651) 57.425,66.986 C31.2@57.683,67.244 ; R23.1@62.307,63.958 62.973,64.623 cw(c63.332,64.265) 63.691,64.624 ; 63.692,64.623 64.466,63.848 ; R22.2@63.745,62.524 64.458,63.236 ; 64.458,63.857 cw(c64.147,63.547) 64.458,63.236 ; 64.506,63.808 v1@68.213,60.101 ; 65.078,63.236 ccw(c64.768,62.926) 64.458,63.236
  other v1: 68.207,60.121
VCC-IO: C41.2 C42.2 C43.2 C44.2 R21.2 R22.1 U1.50 U1.57 U1.104 U1.127 | length 15.7
  Top Layer w0.178: v1(48.807,52.661) cw(c49.56,52.661) 49.027,53.193 U1.50@50.071,54.236 ; v1(51.012,51.217) U1.57@52.05,52.256 ; U1.127@56.293,69.509 57.167,70.383 ccw(c56.703,70.848) 57.36,70.848 57.36,71.322 57.314,71.367 C41.2@57.314,71.78 ; v1(62.478,61.247) 61.884,61.841 cw(c62.008,61.965) 61.883,62.089 U1.104@62.798,63.003
  Top Layer w0.381: v1(56.533,70.967) 56.533,71.001 C41.2@57.314,71.78
  Bottom Layer w0.203: C43.2@63.028,63.232 C43.2@63.032,63.232 63.095,62.972 63.018,62.12 R22.1@63.081,61.859
  Bottom Layer w0.254: v1@48.842,52.625 49.777,53.559 49.92,53.559 C42.2@49.958,53.522
  Bottom Layer w0.381: C44.2@51.58,51.786 v1(51.012,51.217) R21.2@52.014,50.215 ; v1@62.556,61.334 R22.1@63.081,61.859
VCC-MCSI: C28.2 R24.2 R25.1 U1.85 | length 4.9
  Top Layer w0.178: U1.85@61.667,55.933 62.134,55.465 62.681,54.919 v1(62.681,54.909)
  Bottom Layer w0.381: C28.2@62.112,55.947 62.049,55.884 62.049,55.83 62.112,55.768 62.112,55.479 v1@62.672,54.918 ; C28.2@62.191,56.02 R24.2@62.841,56.669 ; R24.2@62.837,56.673 R25.1@63.689,57.525
VCC-PHY: R25.2 R26.1 U1.93 | length 19.4
  Top Layer w0.178: v1(62.427,58.77) 62.767,59.11 cw(c62.891,58.986) 63.015,59.11 U1.93@63.929,58.195
  Bottom Layer w0.381: R26.1@50.544,67.053 51.91,68.419 cw(c52.344,67.985) 52.778,68.419 52.779,68.418 v1(62.427,58.77) 62.917,58.279 R25.2@63.025,58.19
VCC-PLL: C30.2 R33.2 U1.76 | length 3.3
  Top Layer w0.178: v1(58.083,54.425) U1.76@59.121,53.387
  Bottom Layer w0.381: v1(58.083,54.425) 58.668,53.84 58.668,53.832 ; C30.2@58.388,53.528 R33.2@59.114,54.253
VCC-RTC: C29.2 R28.2 U1.98 | length 3
  Top Layer w0.178: U1.98@64.495,61.306 65.835,62.646 R28.2@65.843,62.646 ; R28.2@65.998,62.535 R28.2@65.998,62.537 ; C29.2@66.754,61.777 C29.2@66.754,61.78
  Top Layer w0.381: R28.2@65.998,62.535 C29.2@66.754,61.78
VCC-USB: C27.2 R23.2 R24.1 U1.109 | length 11.5
  Top Layer w0.178: v1(59.73,62.758) 59.73,62.761 61.383,64.415 U1.109@61.383,64.418
  Top Layer w0.381: v1(59.73,62.758) 60.474,62.014 ; 60.475,62.013 cw(c58.99,60.53) 61.089,60.53 v1(61.089,58.405)
  Bottom Layer w0.178: C27.2@60.891,64.018 C27.2@60.904,64.018 ; R23.2@61.63,63.293 R23.2@61.642,63.293
  Bottom Layer w0.381: v1(59.73,62.758) 60.914,63.942 60.914,63.996 C27.2@60.891,64.018 ; C27.2@60.904,64.018 R23.2@61.63,63.293 ; v1(61.089,58.405) R24.1@62.157,57.337
VCC_PE: R26.2 U1.12 U1.29 | length 12.1
  Top Layer w0.178: U1.29@46.111,61.872 v1(47.149,60.834) ; U1.12@50.919,66.68 v1(51.957,65.642)
  Bottom Layer w0.381: v1(47.149,60.834) 48.094,60.834 ccw(c48.094,62.275) 49.113,61.256 52.415,64.558 ccw(c52.101,64.871) 52.415,65.185 v1(51.957,65.642) ; R26.2@51.208,66.388 v1@51.955,65.642
VDD11: C124.2 C125.2 C126.2 C127.2 C128.2 C129.2 C130.2 C131.2 C132.2 C133.2 C134.2 C135.2 C136.2 FB2.2 U13.1 U13.12 U13.18 U13.30 U13.34 U13.45 | length 32.7
  Top Layer w0.254: C131.2@64.391,40.917 v1(65.22,40.917) U13.18@67.982,40.917 ; FB2.2@70.172,33.027 C136.2@71.583,33.027 ; C136.2@71.982,33.009 v1(71.982,34.671) U13.30@71.982,36.417 ; v1(73.937,34.671) 73.937,33.092 C133.2@73.982,33.047 ; v1@73.982,34.671 U13.34@73.982,36.417 ; U13.45@76.482,41.917 77.93,41.917 v1(77.953,41.94)
  Top Layer w0.381: C131.2@64.289,40.938 C127.2@64.289,41.994 ; v1(68.739,45.162) U13.12@69.402,45.162 ; U13.1@75.043,44.587 v1(76.381,44.587) ; v1@76.381,44.782 76.381,46.686 cw(c76.795,46.686) 76.795,47.101 C129.2@78.143,47.101
  Bottom Layer w0.178: C134.2@73.937,36.702 cw(c73.982,36.702) C134.2@73.982,36.747
  Bottom Layer w0.381: C124.2@67.912,45.858 C126.2@68.926,45.858 68.837,45.858 68.799,45.82 68.799,45.731 68.78,45.713 68.78,45.204 v1(68.739,45.162) ; v1(71.982,34.671) C130.2@71.982,36.747 C134.2@73.982,36.747 C132.2@74.982,36.747 ; v1(73.937,34.671) C134.2@73.937,36.702 ; C128.2@74.549,44.587 v1(76.381,44.587) ; C125.2@76.495,42.044 76.495,41.928 77.941,41.928 v1(77.953,41.94)
VDD33: C111.2 C112.2 C113.2 C114.2 C115.2 C116.2 C117.2 C118.2 C119.2 C120.2 C121.2 C122.2 C123.2 FB1.2 U13.7 U13.13 U13.23 U13.25 U13.33 U13.37 U13.40 U13.48 | length 41.7
  Top Layer w0.178: U13.37@76.479,37.85 76.479,37.914 U13.37@76.482,37.917 ; U13.48@76.482,43.417 77.889,43.417 77.915,43.442 78.004,43.442 78.143,43.582 C111.2@78.143,43.671 C111.2@78.144,43.899 ; v1(77.152,45.948) cw(c77.172,45.948) v1@77.172,45.967 ; C119.2@78.144,45.739 C119.2@78.144,45.967
  Top Layer w0.229: U13.7@71.982,44.917 71.982,46.396 cw(c72.762,46.396) 72.211,46.947 v1(72.439,47.176)
  Top Layer w0.254: C121.2@64.289,44.106 v1(65.22,44.106) 67.735,44.106 cw(c67.735,43.858) 67.982,43.858 U13.13@67.982,43.417 ; v1(65.22,38.417) U13.23@67.982,38.417 ; C114.2@72.904,33.047 72.898,33.053 v1(72.898,34.671) 72.948,34.671 73.215,34.938 ccw(c72.571,35.582) 73.482,35.582 U13.33@73.482,36.417 ; U13.40@76.482,39.417 78.668,39.417 ccw(c78.668,40.921) 79.73,39.856 ccw(c78.668,40.921) v1(79.732,39.857)
  Top Layer w0.381: FB1.2@64.288,38.433 65.204,38.433 v1(65.22,38.417) ; FB1.2@64.289,38.47 C123.2@64.289,39.882 ; C120.2@64.289,43.05 C121.2@64.289,44.106 C122.2@64.289,45.162 ; C117.2@68.746,33.047 v1(68.746,34.671) 68.746,36.029 cw(c69.133,36.029) 69.133,36.417 U13.25@69.398,36.417 ; v1(76.479,36.982) U13.37@76.479,37.85 ; v1@77.172,45.967 C119.2@78.144,45.967 ; C111.2@78.143,43.671 78.144,43.899 78.144,45.739 C119.2@78.144,45.967 ; C119.2@78.144,45.993 C119.2@78.144,45.967
  Bottom Layer w0.381: C112.2@70.975,44.587 C113.2@71.989,44.587 71.989,46.091 cw(c73.52,46.091) v1(72.439,47.176) ; C115.2@76.457,40.417 cw(c76.457,40.397) 76.477,40.397 76.477,39.82 ; C116.2@76.477,39.417 76.477,39.82 ; v1(76.479,36.982) C116.2@76.479,39.417 ; v1(79.732,39.857) 76.514,39.857 76.477,39.82
VDD-CPU: C37.2 C38.2 C39.2 C40.2 R35.2 R36.1 U1.20 U1.21 U1.25 U1.26 U1.38 U1.47 U1.51 U1.56 | length 28.9
  Top Layer w0.178: U1.38@46.677,57.63 v1(47.715,58.668) ; U1.47@49.222,55.084 50.077,55.939 cw(c50.26,55.756) 50.444,55.939 v1(50.725,55.658) 51.194,55.189 51.195,55.188 cw(c50.998,54.991) 51.195,54.794 U1.51@50.353,53.953 ; U1.56@51.767,52.539 v1(52.806,53.577)
  Bottom Layer w0.178: R35.2@46.678,63.285 R35.2@46.793,63.202 ; v1(47.579,65.416) v1@47.582,65.416
  Bottom Layer w0.381: v1(46.062,63.9) R35.2@46.678,63.285 ; R35.2@46.793,63.202 C40.2@48.295,64.704 ; v1@47.582,65.416 C40.2@48.198,64.801 ; C39.2@49.945,54.884 v1@50.72,55.658 ; v1(50.725,55.658) 51.458,56.391 cw(c51.877,55.973) 52.295,56.392 52.297,56.39 53.74,54.947 53.743,54.944 ; v1@52.837,53.577 53.743,54.483 54.375,55.115 54.394,55.134 ; 53.552,54.294 ccw(c53.132,54.714) 53.552,55.135 ; 53.553,55.134 ccw(c53.974,55.554) 54.394,55.134 ; v1(59.841,56.511) 58.313,58.039 58.312,58.04 ccw(c57.806,57.534) 57.299,58.04 54.394,55.134 ; v1@59.871,56.498 R36.1@60.615,55.755
VDD-PHY: R36.2 U1.88 | length 5.9
  Top Layer w0.178: U1.88@62.048,57.249 U1.88@62.515,56.781 63.498,55.798 63.498,54.723 63.052,54.278 v1(62.088,54.278)
  Bottom Layer w0.381: R36.2@61.28,55.087 v1(62.088,54.278)
VDD-SYS: C33.2 C34.2 C35.2 C36.2 R34.2 R35.1 U1.19 U1.58 U1.64 U1.80 U1.108 U1.126 | length 35.5
  Top Layer w0.178: U1.19@48.939,64.7 v1(49.977,63.662) ; U1.58@52.333,51.973 v1(53.829,53.469) ; v1(52.992,49.237) U1.64@54.03,50.276 ; v1(55.537,68.188) U1.126@56.575,69.226 58.177,70.828 C33.2@58.266,70.828 ; v1(59.156,55.897) 59.237,55.534 U1.80@60.252,54.519 ; v1(61.093,62.632) 60.752,62.972 cw(c60.876,63.096) 60.752,63.22 U1.108@61.667,64.135
  Top Layer w0.381: v1(49.977,63.662) 51.012,63.662 v1(55.537,68.188) ; v1(53.829,53.469) 56.267,55.906 cw(c57.689,54.484) 57.689,56.496 57.712,56.496 cw(c57.712,54.453) 58.911,56.106 cw(c57.712,54.453) v1(59.156,55.897)
  Bottom Layer w0.178: R34.2@53.645,71.068 53.842,71.068 R34.2@53.905,71.005
  Bottom Layer w0.381: R35.1@47.458,62.537 47.824,62.171 ccw(c48.137,62.482) 48.137,62.041 ccw(c48.137,62.57) 48.512,62.196 v1(49.977,63.662) ; R34.2@53.905,71.005 C34.2@55.356,69.554 55.098,69.296 ccw(c55.433,68.961) 55.098,68.626 v1(55.537,68.188) ; v1(59.156,55.897) 59.156,55.838 59.901,55.094 59.901,55.065 C35.2@59.803,54.968
VIN+: C152.2 C153.2 D14.2 J10.1 J10.2 R125.1 U19.2 U20.2 U20.3 | length 53.1
  Top Layer w0.889: 11.465,107.54 cw(c12.816,107.54) 12.816,108.891 45.769,108.891 ccw(c45.769,110.367) 47.244,110.367 47.244,117.101 ccw(c45.927,117.101) 45.927,118.417 C153.2@41.127,118.417 ; J10.2@13.936,110.243 ccw(c15.287,110.243) 15.287,108.891
VLED+: C98.2 J4.2 U12.3 | length 15.2
  Top Layer w0.305: J4.2@1.345,51.75 3.901,51.75 cw(c3.901,51.206) 4.445,51.206 4.445,49.315 ccw(c5.021,49.315) 5.021,48.739 v1(11.154,48.739)
  Bottom Layer w0.432: v1(11.154,48.739) U12.3@14.031,48.739
VLED-: J4.1 R84.2 R86.2 | length 8.8
  Bottom Layer w0.178: R84.2@10.983,50.533 R84.2@11.154,50.705
  Bottom Layer w0.432: v1(3.209,50.884) 10.989,50.884 11.154,51.049 11.154,51.413 ; R84.2@10.983,50.533 R84.2@11.154,50.533
VRA1: C22.2 U1.117 | length 2.2
  Top Layer w0.178: U1.117@59.121,66.68 60.659,68.218 C22.2@60.612,68.264
VRA2: C21.2 R31.2 U1.118 | length 3.7
  Top Layer w0.178: U1.118@58.838,66.963 59.672,67.796 ccw(c59.282,68.185) 59.833,68.185 59.833,68.846 59.839,68.851 59.839,69.049 C21.2@59.776,69.112 ; R31.2@59.026,69.854 R31.2@59.033,69.854
  Top Layer w0.381: R31.2@58.931,69.956 C21.2@59.75,69.137
VSD: D1.2 J1.4 R2.2 R3.2 R4.2 R5.2 R6.2 R7.2 R8.1 | length 23.5
  Top Layer w0.305: D1.2@94.598,61.024 v1(94.598,60.049) 94.598,56.953 ccw(c95.063,56.953) 95.063,56.488 99.031,56.488 ccw(c99.031,56.88) 99.422,56.88 J1.4@99.422,58.505
  Bottom Layer w0.305: v1(94.598,60.049) R8.1@94.598,61.969 R5.2@95.917,61.969 R3.2@102.477,61.969 R7.2@105.118,61.969
W_DIS: pad.2@74.8,73.492 U14.4 | length 2.8
  Top Layer w0.381: pad.2@74.8,73.492 U14.4@74.8,76.25
WAKEUP: pad.2@70.9,73.492 U14.1 | length 2.8
  Top Layer w0.381: pad.2@70.9,73.492 U14.1@70.9,76.25
X24MIN: C1.2 U1.75 X1.1 | length 5.3
  Top Layer w0.178: U1.75@58.838,53.105 60.605,51.338 ccw(c61.481,52.214) X1.1@61.481,50.975 ; X1.1@61.777,51.179 X1.1@62.344,51.179
  Top Layer w0.254: X1.1@62.344,51.179 C1.2@63.218,52.052
X24MOUT: C2.2 U1.74 X1.3 | length 7.3
  Top Layer w0.178: U1.74@58.555,52.822 61.11,50.267 cw(c60.184,49.34) 61.494,49.35 61.494,48.592 cw(c61.253,48.592) X1.3@61.423,48.421 X1.3@60.878,48.421
  Top Layer w0.254: C2.2@60.051,47.594 X1.3@60.878,48.421
X32KIN: C5.2 R122.1 U1.96 X2.1 | length 7.1
  Top Layer w0.178: U1.96@64.778,59.044 65.627,59.893 cw(c65.82,59.7) 66.014,59.893 R122.1@67.666,58.241 67.835,58.088 68.341,57.582 ccw(c68.535,57.776) 68.729,57.582 X2.1@69.107,57.96
  Top Layer w0.254: X2.1@69.241,58.083 C5.2@70.128,58.97
X32KOUT: C6.2 R122.2 U1.95 X2.2 | length 6.6
  Top Layer w0.178: U1.95@64.495,58.761 66.155,57.101 ccw(c66.34,57.286) 66.525,57.101 R122.2@67.001,57.577 ; X2.2@67.052,55.897 X2.2@67.634,55.897 ; R122.2@67.155,57.407 67.66,56.901 cw(c67.466,56.708) 67.66,56.514 X2.2@67.283,56.136
  Top Layer w0.254: C6.2@66.376,55.221 X2.2@67.052,55.897
pads on no net: J3.4 J4.35 LS1.3 U1.81 U1.82 U1.83 U1.84 U1.86 U1.87 U1.113 U1.114 U1.119 U1.120 U1.121 U1.124 U1.125 U3.7 U4.7 U4.8 U4.9 U4.10 U4.11 U4.12 U4.13 U4.14 U4.15 U8.9 U13.16 U13.17 U13.19 U13.20 U13.28 U13.29 U13.31 U13.32 U13.43 U13.44 U13.46 U13.47 U14.3 U14.18 U14.23 U14.24 U14.25 U14.26 U14.27 U14.28 U14.29 U14.30 U14.31 U14.32 U14.33 U14.37 U14.38 U14.39 U14.40 U14.41 U14.42 U14.43 U14.44 U14.45 U14.55 U14.113 U14.114 U14.116 U14.117 U14.118 U14.119 U14.120 U14.121 U14.122 U14.123 U14.124 U14.125 U14.126 U14.127 U14.129 U14.130 U14.131 U14.132 U14.133 U14.134 U14.135 U14.136 U14.137 U14.138 U14.139 U14.140 U14.141 U14.142 U14.143 U14.144 U15.1 U15.20 U19.5 U19.8